# Altium PCB Grant..PcbDoc (part 5 of 5)
Units mil, origin at the board's own origin, x right, y up, seen from the top; angles counter-clockwise.
Board outline 2981 x 2481 mil, 2 copper layers (Top Layer, Bottom Layer), stack 57 mil thick; 181 components, 108 nets, 631 pads, 224 vias.
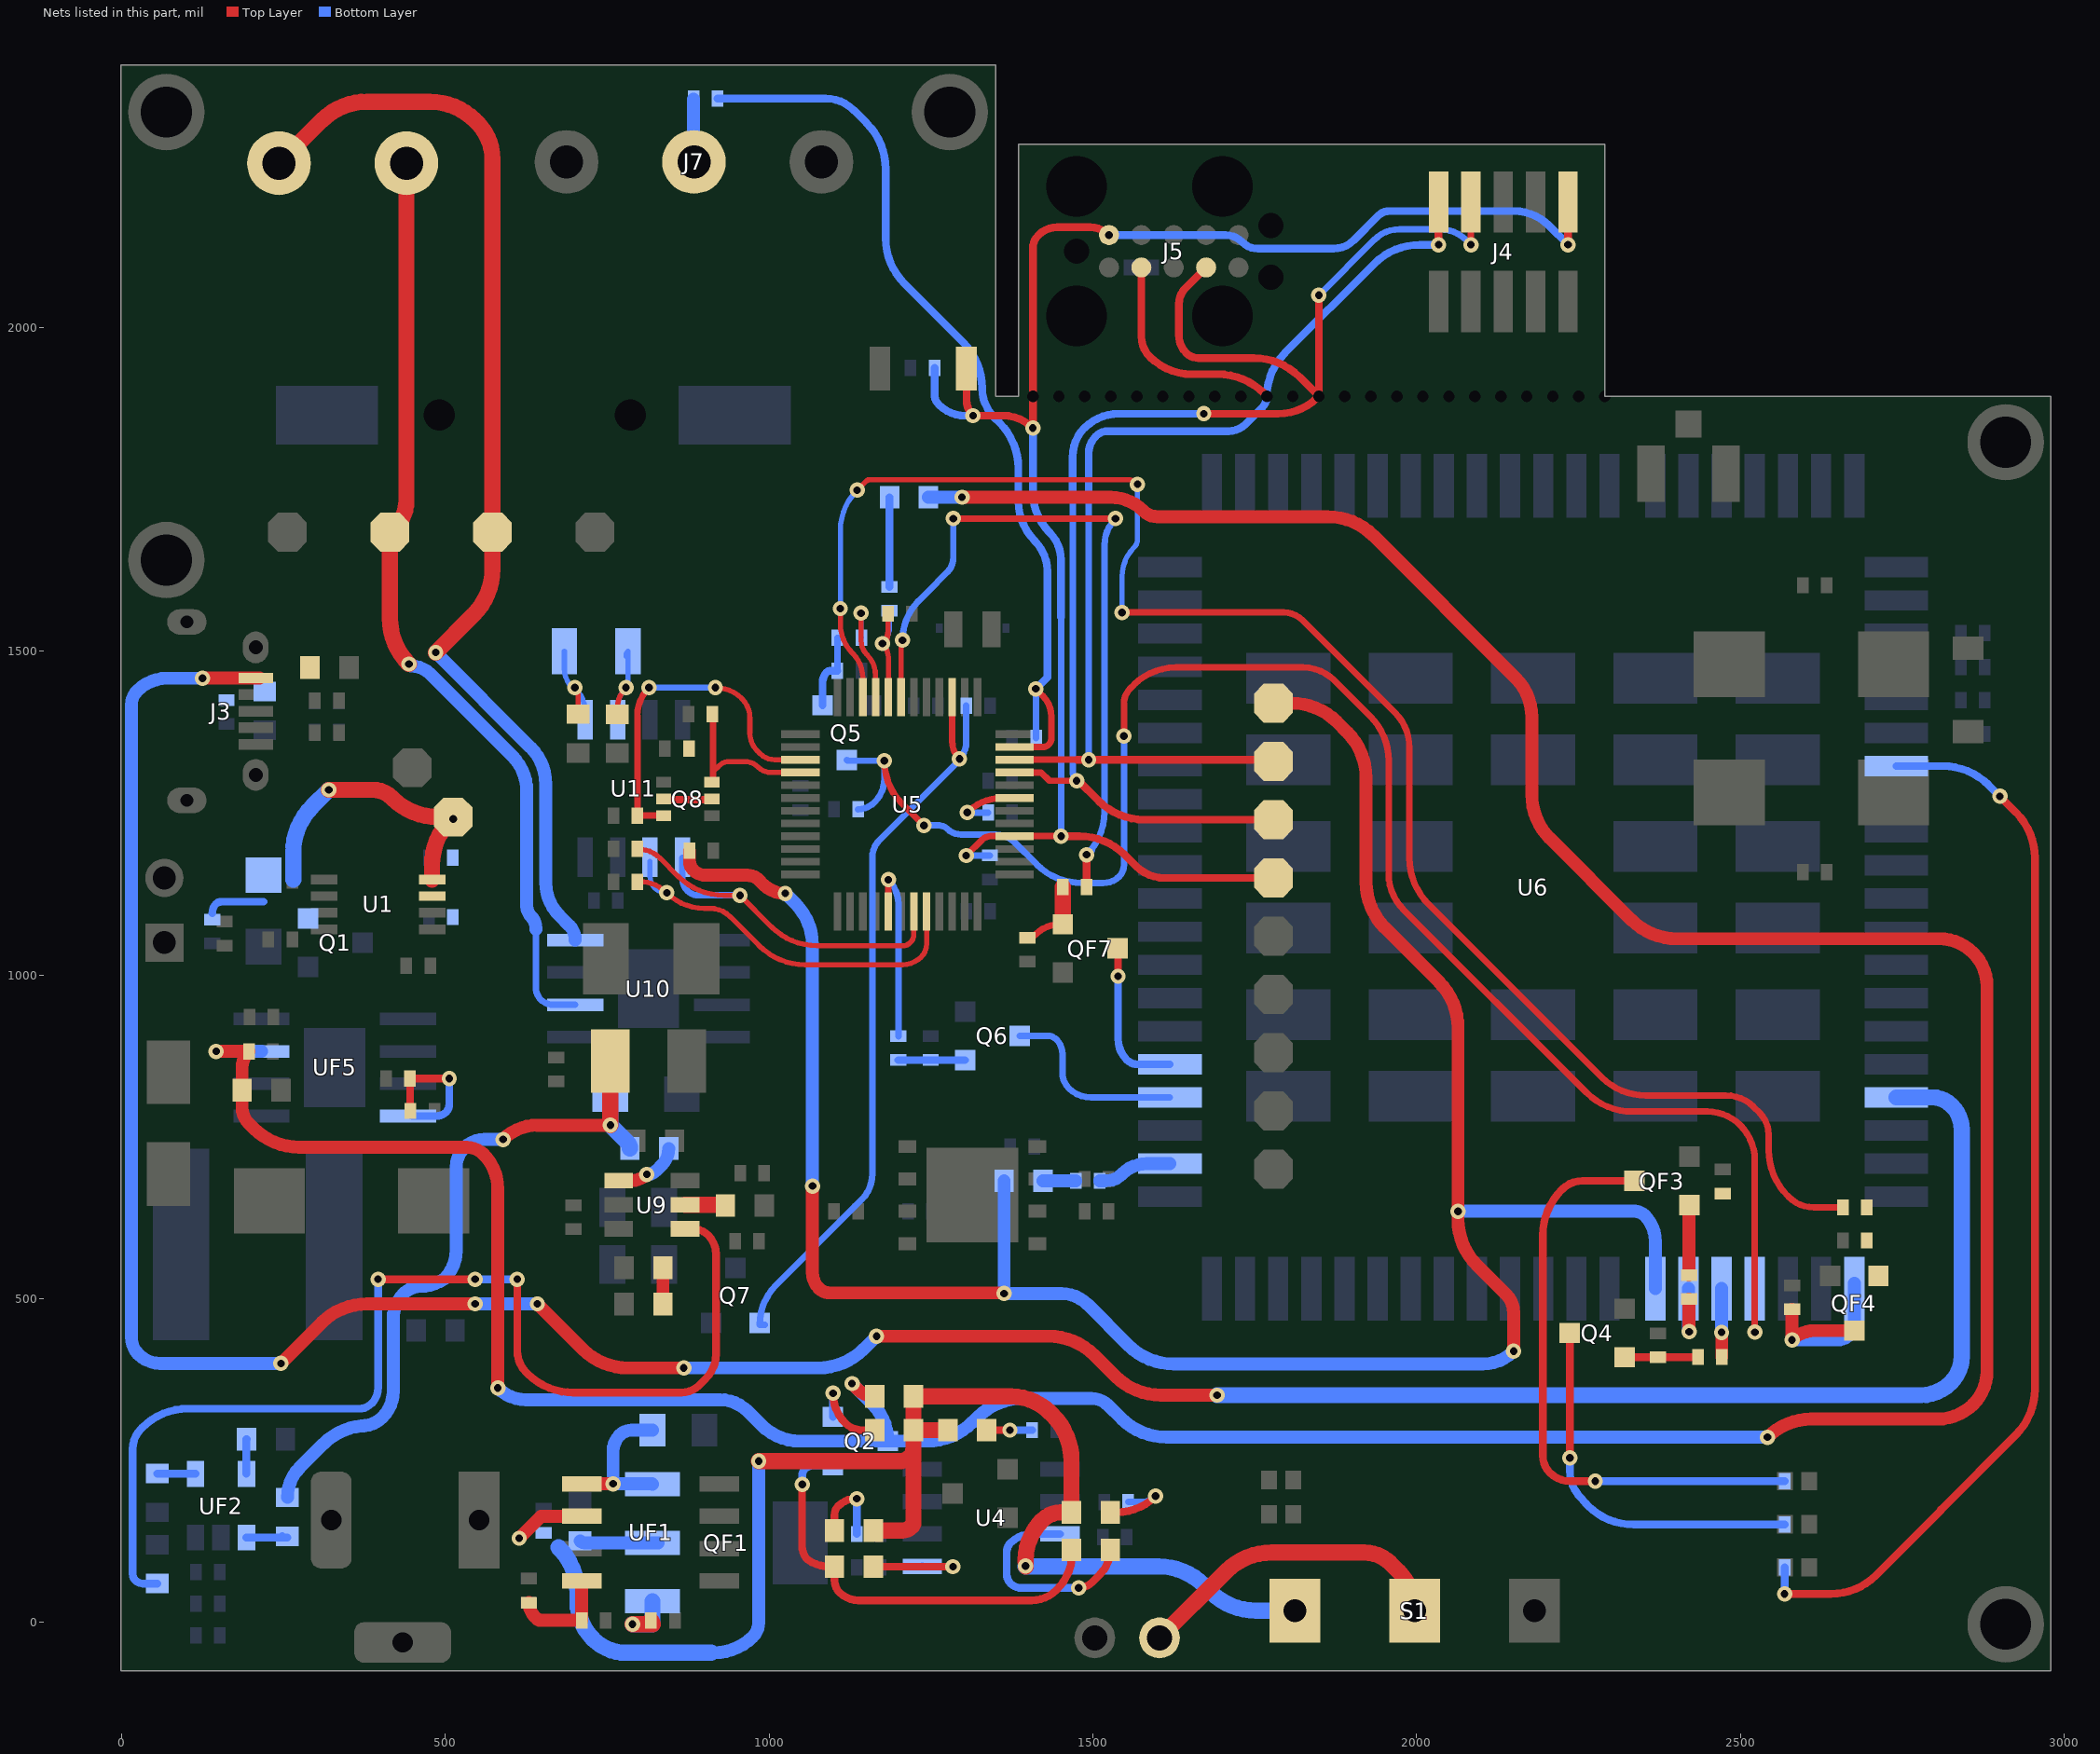
[diagram p3: the nets of this part, all layers, seen from the top]

## Via types
v1: diameter 23.62, hole 11.81, Top Layer to Bottom Layer, 224 vias

## Nets (pads, with @x,y where several pads share a name; then routed paths per layer and width w, separated by ;. In a path a pad name is that pad's centre, name@x,y a point inside that pad or via, vN(x,y) a via of type N, cw(c..) or ccw(c..) an arc to the next point about the centre after c; other vN are vias at no path point) (continued)
NETMODE_: R13.2 U6.5 | length 106.3
  Top Layer w20: R13.2@2471.5,410 v1@2471.5,448.68
  Bottom Layer w20: v1@2471.31,448 U6.5@2471.31,515.65
  other v1: 2471.18,448
NetQ2_1: Q2.1 SB16.2 SB17.2 | length 685.1
  Top Layer w12: v1(1051.13,213) 1051,212.87 1051,117.5 ccw(c1080.15,117.5) 1059.54,96.88 ccw(c1094.46,147.46) 1094.46,86 SB16.2@1101,86 1101,65.31 ccw(c1128.31,65.31) 1109,46 ccw(c1137.97,74.97) 1137.97,34 1405.37,34 ccw(c1405.37,88.63) 1444,50 ccw(c1383.64,110.36) 1466.23,88.77 ccw(c1407.05,98.37) 1467,98.37 SB17.2@1467,112
  Bottom Layer w12: v1(1051.13,213) 1051.13,227.16 cw(c1064.34,227.16) 1055,236.5 cw(c1069.71,221.79) 1069.71,242.59 Q2.1@1098.68,242.59
NetQ2_2: Q2.2 SB20.2 | length 138.7
  Top Layer w12: v1(1098.68,354) 1098.68,353.63 ccw(c1163.21,353.63) 1117.58,308 ccw(c1144.13,334.56) 1144.13,297 SB20.2@1163,297 ccw(c1160.59,294.59) SB20.2@1160.59,298
  Bottom Layer w12: Q2.2@1098.68,317.4 v1(1098.68,354)
NetQ4_1: Q4.1 R13.1 R16.1 | length 112.2
  Top Layer w12: Q4.1@2321.32,409.59 R13.1@2433.51,409.59
NetQ4_3: Q4.3 R11.1 | length 587
  Top Layer w12: v1(2236.68,254) Q4.3@2236.68,446.99
  Bottom Layer w12: v1(2236.68,254) 2236.68,234.71 ccw(c2297.84,234.71) 2254.59,191.45 ccw(c2322.36,243.36) 2262,183 2264.71,180.29 ccw(c2335.42,251) 2335.42,151 R11.1@2568.5,151
NetQ5_1: Q5.1 R14.1 R17.1 | length 120.7
  Bottom Layer w10: R17.1@1105.5,1470 R14.1@1105.5,1521
  Bottom Layer w12: Q5.1@1082.59,1416.69 1082.59,1452.03 cw(c1104.47,1452.03) 1089,1467.5 cw(c1095.04,1461.46) 1095.04,1470 R17.1@1105.5,1470
NetQ6_1: Q6.1 R18.1 R19.1 | length 103.1
  Bottom Layer w12: R18.1@1199.61,868.5 1249.41,868.5 1249.5,868.59 Q6.1@1302.68,868.59
NetQF1_1: QF1.1 RF2.1 | length 104
  Top Layer w25: v1(789,-3) 819.96,-3 820,-3.04 ccw(c811.46,-3.04) RF2.1@817.5,3
  Bottom Layer w25: v1(789,-3) 819.83,-3 QF1.1@819.83,32.45
NetQF3_1: QF3.1 RF7.1 RF8.1 | length 108.3
  Top Layer w20: RF7.1@2421,536.39 2421,644.27 QF3.1@2421.32,644.59
NetQF3_3: QF3.3 R31.1 | length 930.2
  Top Layer w12: v1(2276,218) 2237.38,218 cw(c2237.38,262.38) 2206,231 cw(c2232.56,257.56) 2195,257.56 2195,597.58 cw(c2295,597.58) 2224.29,668.29 2225,669 cw(c2256.37,637.63) 2256.37,681.99 QF3.3@2336.68,681.99
  Bottom Layer w12: v1(2276,218) R31.1@2568.5,218
NetQF4_1: QF4.1 RF10.1 RF11.1
NetQF7_1: QF7.1 RF13.1 RF14.1 | length 117.9
  Top Layer w10: RF14.1@1399,1057.5 ccw(c1399,1075.35) 1411.62,1062.73 cw(c1449.48,1024.88) 1449.48,1078.41 QF7.1@1453.68,1078.41
  Top Layer w25: RF13.1@1453.5,1136 1453.5,1078.59 QF7.1@1453.68,1078.41
NetR6_2: R6.2 SB15.2 | length 121.6
  Top Layer w12: SB15.2@1527,170 1536.64,170 ccw(c1536.64,255.36) v1(1597,195)
  Bottom Layer w10: R6.2@1554.5,186 1575.27,186 ccw(c1575.27,216.73) v1(1597,195)
NetR7_2: R7.2 SB19.2 | length 70.5
  Top Layer w12: SB19.2@1336,297 v1(1372,297)
  Bottom Layer w12: v1(1372,297) R7.2@1406.5,297
NetR12_2: R12.2 SB4.2 | length 50.5
  Bottom Layer w20: SB4.2@1423,682 R12.2@1473.5,682
NetR21_1: R21.1 SB13.1 | length 56.5
  Top Layer w20: SB13.1@836,491.5 R21.1@836,548
NetRP1_2: RP1.2 SB18.2 | length 125.5
  Top Layer w12: SB18.2@1101,142 1101,165.51 cw(c1121.49,165.51) 1107,180 cw(c1133.56,153.44) 1133.56,191 v1(1135.5,191)
  Bottom Layer w12: RP1.2@1135.5,136.5 v1(1135.5,191)
NetRP3_2: RP3.2 SB14.2 | length 138.5
  Bottom Layer w12: RP3.2@1186,1599.5 SB14.2@1186,1738
NetSB5_2: SB5.2 U9.5 | length 62.6
  Top Layer w25: U9.5@870.18,645 930.09,645 cw(c930.09,641.59) SB5.2@932.5,644
NetSB6_2: SB6.2 UF2.5 | length 53.7
  Bottom Layer w12: UF2.5@192.74,229.43 192.74,282.74 SB6.2@193,283
NetSB7_1: SB7.1 U9.1 | length 102.5
  Top Layer w20: U9.1@767.82,682.4 787.83,682.4 ccw(c787.83,715.17) v1(811,692)
  Bottom Layer w20: v1(811,692) ccw(c811,713.31) 826.07,698.24 834.52,706.69 ccw(c809.2,732) SB7.1@845,732
NetSB8_1: SB8.1 UF2.1 | length 68.6
  Bottom Layer w12: UF2.1@192.74,131 255.5,131 SB8.1@256,131 ; SB8.1@243.17,131 ccw(c243.17,137.83) SB8.1@248,133
NetSB9_1: SB9.1 U9.4 | length 1758.6
  Top Layer w12: v1(396,530) v1(546,530) ; v1(611,530) 611,419.8 ccw(c658.8,419.8) 625,386 626.71,384.29 ccw(c697.42,455) 679.77,356.57 ccw(c697.42,455) 697.42,355 864.94,355 ccw(c864.94,392.56) 891.5,366 902.63,377.13 ccw(c865.51,414.24) 918,414.24 918,569.03 ccw(c877.03,569.03) 906,598 ccw(c882.83,574.83) 882.83,607.6 U9.4@870.18,607.6
  Bottom Layer w12: SB9.1@55,60 33.07,60 cw(c33.07,77.07) 21,65 cw(c30.66,74.66) 17,74.66 17,267.62 cw(c61.38,267.62) 30,299 32.01,301.01 cw(c102,231.02) 102,330 366.69,330 ccw(c366.69,357.31) 386,338 ccw(c361.86,362.14) 396,362.14 396,478.21 ; 395.79,478 396,478.21 ; v1(396,530) 396,478.21 ; v1(546,530) v1(611,530)
NetSB10_2: SB10.2 UF2.4 | length 59.2
  Bottom Layer w12: SB10.2@55,230 ccw(c56.39,231.39) 56.39,229.43 UF2.4@114,229.43
NetSB16_1: SB16.1 U4.1 | length 170.4
  Top Layer w12: SB16.1@1161,86 v1(1284,86)
  Bottom Layer w12: U4.1@1236.7,86.5 ccw(c1237.91,87.71) 1237.91,86 v1(1284,86)
NetSB17_1: SB17.1 U4.7 | length 356
  Top Layer w12: v1(1478,53.21) ccw(c1478,82.69) 1498.84,61.84 1511.45,74.45 ccw(c1473.89,112) SB17.1@1526.02,101.84 ; SB17.1@1527,112 cw(c1473.89,112) SB17.1@1526.02,101.84 ; SB17.1@1529,102.38 1529,112 cw(c1510.2,112) SB17.1@1526.02,101.84
  Bottom Layer w12: U4.7@1449.3,136.5 1405.59,136.5 ccw(c1405.59,90.41) 1373,123 ccw(c1387.49,108.51) 1367,108.51 1367,74.49 ccw(c1387.49,74.49) 1373,60 ccw(c1389.39,76.39) 1389.39,53.21 v1(1478,53.21)
NETSTATUS_: RF7.2 U6.6 | length 119.4
  Top Layer w20: v1(2421,449) RF7.2@2421,499.39
  Bottom Layer w20: v1@2420.13,449 v1@2420.13,451.09 ; U6.6@2420.13,515.65 v1@2420.13,451.09 ; v1(2421,449) cw(c2423.09,451.09) v1@2420.13,451.09
NRST_: C18.1 J4.10 J5.10 P9.1 pad.NC@1407.37,1894 R9.1 SW1.1 U5.40 | length 2709.8
  Top Layer w10: v1(1304.5,1184.5) 1329.08,1209.08 cw(c1342,1196.16) 1342,1214.43 U5.40@1379.09,1214.43 v1(1451,1214.43)
  Top Layer w12: SW1.1@1304.93,1937 1304.93,1888.31 ccw(c1339.31,1888.31) v1(1315,1864) 1361.5,1864 cw(c1361.5,1799.13) v1(1407.37,1845) pad.NC@1407.37,1894 1407.37,2122.17 cw(c1436.83,2122.17) 1416,2143 cw(c1444.97,2114.03) 1444.97,2155 1496.03,2155 cw(c1496.03,2114.03) v1(1525,2143) ; v1(1451,1214.43) 1479.15,1214.43 cw(c1479.15,1114.43) 1549.86,1185.14 1567,1168 ; 1567.03,1167.97 ccw(c1610.46,1211.46) 1610.46,1150 P9.1@1779,1150 ; v1(2234,2128) J4.10@2234,2194
  Bottom Layer w10: v1(1304.5,1184.5) R9.1@1341,1184.5 ; 1450.81,1553 1450.81,1214.62 v1(1451,1214.43)
  Bottom Layer w12: C18.1@1255.5,1938 1255.5,1896.69 ccw(c1277.69,1896.69) 1262,1881 ccw(c1303.04,1922.04) 1303.04,1864 v1(1315,1864) ; v1(1407.37,1845) 1407.37,1745.88 ccw(c1494.88,1745.88) 1433,1684 cw(c1390,1641) 1450.81,1641 1450.81,1553 ; v1(1525,2143) 1704.44,2143 cw(c1704.44,2105.44) 1730.97,2132.03 ; 1731.02,2131.98 ccw(c1755.14,2156.14) 1755.14,2122 1871.62,2122 ccw(c1871.62,2166.38) 1903,2135 1940.93,2172.93 cw(c1958,2155.86) 1958,2180 2151,2180 cw(c2151,2105.16) 2203.92,2158.08 v1(2234,2128)
OUT_1: J8.1 P14.1 U10.6 | length 1446.8
  Top Layer w25: P14.1@414.14,1698.79 422.29,1690.63 ccw(c379.9,1733.03) 439.85,1733.03 J8.1@439.85,2254 ; P14.1@414.33,1684 414.33,1551.09 ccw(c514.33,1551.09) v1(443.62,1480.38)
  Bottom Layer w10: 639.81,1070.81 639.81,980.77 ccw(c667.77,980.77) 646.53,962.58 ccw(c667.26,983.31) 667.26,954 U10.6@700.62,954
  Bottom Layer w20: v1@446.71,1477.29 cw(c446.71,1435.04) 476.44,1465.06 cw(c446.71,1435.04) 476.57,1464.93 ; 476.58,1464.92 603.23,1338.27 cw(c548.96,1284) 625.71,1284 625.71,1106.18 ccw(c647.18,1106.18) 632,1091 cw(c613.14,1072.14) 639.81,1072.14 639.81,1070.81
OUT_2: J8.2 P15.1 U10.8 | length 1732.6
  Top Layer w25: J8.2@243,2254 308.71,2319.71 cw(c379.42,2249) 351.42,2345 cw(c379.42,2249) 379.42,2349 475.58,2349 cw(c475.58,2249) 546.29,2319.71 549,2317 cw(c491.86,2259.86) 572.67,2259.86 P15.1@572.67,1684 572.67,1627.09 cw(c472.67,1627.09) 543.38,1556.38 v1(485.15,1498.15)
  Bottom Layer w20: v1(485.15,1498.15) 631.54,1351.76 cw(c574.9,1295.12) 655,1295.12 655,1142.7 ccw(c726.7,1142.7) 676,1092 691.16,1076.84 cw(c668.32,1054) U10.8@700.62,1054
PA2_: Q7.1 R26.1 U5.3 | length 1185.3
  Top Layer w10: U5.3@1282.63,1429 1282.63,1361.45 ccw(c1321.45,1361.45) v1(1294,1334)
  Bottom Layer w10: Q7.1@993.71,459.68 985.41,459.68 cw(c1071.67,459.68) 1010.67,520.67 1143,653 ; 1143.03,653.03 ccw(c1103.42,692.58) 1159.39,692.58 1159.39,1181.69 cw(c1197.31,1181.69) 1170.48,1208.48 1292.59,1330.59 ccw(c1289.17,1334) v1(1294,1334) ccw(c1268.65,1359.35) 1304.5,1359.35 R26.1@1304.5,1416
PA4_: R14.2 U5.9 | length 174.2
  Top Layer w8: v1(1142,1559) 1142,1516.73 ccw(c1172.73,1516.73) 1151,1495 cw(c1118.36,1462.36) 1164.52,1462.36 U5.9@1164.52,1429
  Bottom Layer w8: v1(1142,1559) 1142,1522.21 ccw(c1143.71,1522.21) R14.2@1142.5,1521
PA5_: RF10.2 U5.10 | length 2644.2
  Top Layer w8: v1(1110,1566) 1110,1542.87 ccw(c1174.87,1542.87) 1129,1497 cw(c1090.77,1458.77) 1144.83,1458.77 U5.10@1144.83,1429 ; v1(1136,1749) 1150.07,1763.07 cw(c1154.73,1758.41) 1154.73,1765 1554.51,1765 cw(c1554.51,1746.93) 1567.29,1759.71 v1(1569,1758)
  Top Layer w10: v1(1545,1560) 1795,1560 cw(c1795,1518.96) 1824.02,1547.98 1966.5,1405.5 cw(c1912.18,1351.18) 1989,1351.18 1989,1180.42 ccw(c2089,1180.42) 2018.29,1109.71 2286,842 ccw(c2353.6,909.6) 2353.6,814 2477.54,814 cw(c2477.54,752.54) 2521,796 2529.86,787.14 cw(c2495.72,753) 2544,753 2544,729.42 ccw(c2644,729.42) 2573.29,658.71 2575,657 ccw(c2613.63,695.63) 2613.63,641 RF10.2@2658.5,641
  Bottom Layer w8: v1(1110,1566) 1110,1686.23 cw(c1198.77,1686.23) v1(1136,1749) ; v1(1545,1560) 1545,1615.03 cw(c1609.65,1615.03) 1563.94,1660.75 ccw(c1551.71,1672.97) 1569,1672.97 v1(1569,1758)
PA20_: R18.2 U5.29 | length 294.7
  Top Layer w10: U5.29@1184.2,1098.29 v1(1184.2,1147.2)
  Bottom Layer w10: v1(1184.2,1147.2) cw(c1147,1110) 1199.61,1110 R18.2@1199.61,905.5
PB8_: RF13.2 U5.7 | length 1145.6
  Top Layer w8: U5.7@1203.89,1429 1203.89,1512.16 cw(c1211.09,1512.16) v1(1206,1517.25)
  Top Layer w10: v1(1284.47,1705) v1(1535,1705)
  Top Layer w12: RF13.2@1490.5,1136 v1(1490.5,1185.79)
  Bottom Layer w8: v1(1206,1517.25) cw(c1292.3,1517.25) 1206.01,1518.27 cw(c1292.3,1517.25) v1@1206.04,1519.78
  Bottom Layer w10: v1@1206.04,1519.78 cw(c1292.3,1517.25) 1228.03,1574.85 cw(c1292.3,1517.25) 1231.25,1578.25 ; 1231.28,1578.28 1244.5,1591.5 1275,1622 ccw(c1252.13,1644.87) 1284.47,1644.87 v1(1284.47,1705) ; v1(1490.5,1185.79) ccw(c1424.11,1252.18) 1518,1252.18 1518,1663.96 cw(c1576.04,1663.96) v1(1535,1705)
  Bottom Layer w12: v1(1490.5,1185.79) v1@1497.71,1193
PB9_: RP3.1 RP4.1 U5.8 | length 208.7
  Top Layer w8: v1(1175,1512) ccw(c1154.48,1532.52) 1183.5,1532.52 ; RP4.1@1183.5,1558 1183.5,1532.52 ; U5.8@1184.2,1429 1184.2,1489.78 ccw(c1152.78,1489.78) 1177,1509.8 ccw(c1161.31,1525.49) 1183.5,1525.49 1183.5,1532.52
  Bottom Layer w8: v1(1175,1512) ccw(c1148.44,1538.56) 1186,1538.56 RP3.1@1186,1562.5
PWRKEY: QF7.3 U6.21 | length 244.1
  Top Layer w12: QF7.3@1538.32,1041.01 cw(c1536.69,1039.37) 1539,1039.37 v1(1539,998)
  Bottom Layer w12: v1(1539,998) 1539,901.59 ccw(c1585.09,901.59) 1552.5,869 ccw(c1569.13,885.63) 1569.13,862.11 U6.21@1618.95,862.11
RESET_N: Q6.3 U6.20 | length 298.3
  Bottom Layer w10: Q6.3@1387.32,905.99 1430.98,905.99 cw(c1430.98,888.32) 1443.48,900.82 cw(c1420.5,877.83) 1453,877.83 1453,849.14 ccw(c1487.14,849.14) 1463,825 ccw(c1496.97,858.97) 1496.97,810.93 U6.20@1618.95,810.93
RXD: Q8.3 RS2.2 U5.15 | length 551.2
  Top Layer w8: v1(917,1444) cw(c917,1386.06) 957.97,1427.03 cw(c928.33,1397.38) 970.25,1397.38 970.25,1374 ccw(c1009.48,1374) 977,1352 ccw(c1009.48,1374) 981.72,1346.28 ; 981.74,1346.26 986.23,1341.77 ccw(c1008.51,1364.05) 1008.51,1332.54 U5.15@1048.38,1332.54
  Top Layer w10: v1(814.5,1444) ccw(c857.96,1400.54) 796.5,1400.54 796.5,1246.35 Q8.3@839.1,1246.35
  Bottom Layer w10: v1(814.5,1444) v1(917,1444)
SCL_: R24.1 U5.32 U11.6 | length 618.7
  Top Layer w8: R24.1@796.5,1144 800.96,1144 cw(c800.96,1085.96) 812.37,1142.87 cw(c800.96,1085.96) v1(842,1127) ccw(c899.94,1184.94) 899.94,1103 908.62,1103 cw(c908.62,1058.62) 940,1090 984.71,1045.29 ccw(c1055.42,1116) 1055.42,1016 1206.03,1016 ccw(c1206.03,1056.97) 1235,1028 ccw(c1215.06,1047.94) 1243.26,1047.94 U5.32@1243.26,1098.29
  Bottom Layer w8: U11.6@816,1175.7 816,1152.21 ccw(c840.66,1152.21) 823.22,1134.78 ccw(c842,1153.56) v1(842,1127)
SDA_: R23.1 U5.31 U11.5 | length 659.5
  Top Layer w8: R23.1@796.5,1194.75 cw(c796.5,1144.65) 831.93,1180.07 859.71,1152.29 ccw(c930.42,1223) 930.42,1123 v1(955,1123) 1003.42,1074.58 ccw(c1074.13,1145.29) 1074.13,1045.29 1206.63,1045.29 ccw(c1206.63,1061.37) 1218,1050 1218.46,1050.46 ccw(c1206.1,1062.81) 1223.57,1062.81 U5.31@1223.57,1098.29
  Bottom Layer w10: U11.5@866,1180.7 866,1175.7 866,1149.31 ccw(c893.31,1149.31) 874,1130 ccw(c890.9,1146.9) 890.9,1123 v1(955,1123)
SENS_IN: J7.2 R27.2 | length 97.8
  Bottom Layer w20: J7.2@883,2255 R27.2@883,2352.79
SNS_: QF1.3 RF1.1 UF1.1 | length 240.1
  Top Layer w20: UF1.1@710.7,214 v1(759,214)
  Bottom Layer w20: QF1.3@819.83,213.55 ccw(c818.74,212.47) 818.74,214 v1(759,214) 759,264.86 cw(c793.14,264.86) 769,289 cw(c788.31,269.69) 788.31,297 RF1.1@820,297
STATUS_: R10.1 U6.61 | length 1683.5
  Top Layer w12: v1(2568.5,44) 2639.99,44 ccw(c2639.99,143.01) 2710,73 2809.29,172.29 ccw(c2807.59,174) 2810,174 2925.71,289.71 ccw(c2855,360.42) 2955,360.42 2955,1181 ccw(c2856.02,1181) 2926.01,1250.99 v1(2901,1276)
  Bottom Layer w12: v1(2568.5,44) R10.1@2568.5,85 ; U6.61@2741,1322.74 2812.84,1322.74 cw(c2812.84,1222.74) 2883.55,1293.45 v1(2901,1276)
SW_: D3.A L1.2 SB7.2 SB8.2 | length 1128
  Top Layer w20: v1(589,746) cw(c642.11,692.89) 642.11,768 v1(754.89,768)
  Top Layer w25: v1(754.89,768) L1.2@754.89,867
  Bottom Layer w20: SB8.2@256,193 cw(c321.18,193) 275.07,239.07 ; 275.09,239.09 311.76,275.76 cw(c379.91,207.62) 370.53,303.53 ; 402.97,316.97 cw(c370.53,349.4) 376.57,303.93 ; 402.99,316.99 ccw(c363.17,356.76) 419.45,356.76 ; 419.49,356.76 419.45,356.81 419.45,469.46 cw(c472.54,469.46) 435,507 437.1,509.1 cw(c461,485.2) 461,519 ccw(c461,584.18) 498.62,530.95 ccw(c454.95,574.63) 516.71,574.63 516.71,703.33 cw(c558.67,703.33) 529,733 cw(c560.38,701.62) 560.38,746 v1(589,746) ; 370.53,303.53 cw(c379.91,207.62) 376.57,303.93 ; 370.53,303.53 ccw(c370.53,349.4) 376.57,303.93 ; 370.53,303.53 ccw(c370.53,349.4) 376.57,303.93
  Bottom Layer w25: D3.A@754.89,817.99 v1(754.89,768) 780.84,742.05 cw(c770.78,732) SB7.2@785,732
SWDCLK: J4.4 J5.4 P10.1 pad.NC@1849.1,1894 U5.45 | length 2235.1
  Top Layer w10: U5.45@1379.09,1312.86 1420.14,1312.86 1433,1300 v1(1475,1300) v1@1478,1300 ; 1659.77,1953.23 ccw(c1663.31,1980.31) 1663.31,1953 ; v1(2084,2128) J4.4@2084,2194
  Top Layer w12: v1@1478,1300 1508.71,1269.29 ccw(c1579.42,1340) 1579.42,1240 P10.1@1779,1240 ; 1659.77,1953.23 cw(c1663.31,1980.31) 1644,1961 cw(c1670.56,1987.56) 1633.98,1979.02 cw(c1670.56,1987.56) 1633,1987.56 1633,2036.86 cw(c1667.14,2036.86) 1642.98,2060.98 J5.4@1675,2093 ; 1663.31,1953 1748.68,1953 cw(c1748.68,1853) 1819.39,1923.71 pad.NC@1849.1,1894 ; v1(1671.34,1867) 1786.34,1867 ccw(c1786.34,1953.34) 1847.39,1892.29 pad.NC@1849.1,1894 ; v1(1849.1,2050) pad.NC@1849.1,1894
  Bottom Layer w10: 1469,1747 1469,1314.49 ccw(c1489.49,1314.49) v1(1475,1300) ; v1(1849.1,2050) 1935.07,2135.96 ; 1935.09,2135.99 cw(c1973.78,2097.25) 1973.78,2152 2036,2152 cw(c2036,2094.06) 2076.97,2135.03 v1(2084,2128)
  Bottom Layer w12: 1469,1747 1469,1801.54 cw(c1530.46,1801.54) 1487,1845 cw(c1540.11,1791.89) 1540.11,1867 v1(1671.34,1867)
SWDIO: J4.2 J5.2 P11.1 pad.NC@1768.79,1894 U5.46 | length 1977.4
  Top Layer w10: U5.46@1379.09,1332.54 1475.54,1332.54
  Top Layer w12: 1475.54,1332.54 v1(1493.54,1332.54) 1776.46,1332.54 P11.1@1779,1330 ; J5.2@1575,2093 1575,1986.38 ccw(c1619.38,1986.38) 1588,1955 ccw(c1653.18,2020.18) 1653.18,1928 1693.37,1928 cw(c1693.37,1828) 1764.08,1898.71 pad.NC@1768.79,1894 ; v1(2034,2128) J4.2@2034,2194
  Bottom Layer w10: v1(1493.54,1332.54) 1493.54,1733.12
  Bottom Layer w12: 1493.54,1733.12 1493.54,1805.55 cw(c1531.45,1805.55) 1504.65,1832.35 cw(c1523.1,1813.9) 1523.1,1840 1709.44,1840 ccw(c1709.44,1877.56) 1736,1851 1761.57,1876.57 ccw(c1744.13,1894) pad.NC@1768.79,1894 cw(c1862.43,1894) 1796.21,1960.21 1934.71,2098.71 cw(c2005.42,2028) 2005.42,2128 v1(2034,2128)
TS_: RF3.1 RF4.1 UF1.4 | length 159.6
  Top Layer w20: RF3.1@629,30.5 ccw(c659.18,30.5) 637.84,9.16 641,6 ccw(c648.24,13.24) 648.24,3 RF4.1@710.5,3 710.7,3.2 UF1.4@710.7,64
TXD: Q8.6 RS4.2 U5.16 | length 252.1
  Top Layer w8: 913.5,1314 922.46,1322.96 cw(c939,1306.42) 939,1329.81 962.03,1329.81 cw(c962.03,1299.82) 983.23,1321.03 ; 983.26,1321 ccw(c1002.95,1340.75) 1002.95,1312.86 U5.16@1048.38,1312.86
  Top Layer w10: RS4.2@913.5,1403 913.5,1314 913.5,1296.93 913.9,1296.53 Q8.6@914.23,1296.86
USB_BOOT: R12.1 U6.115 | length 115.6
  Bottom Layer w20: R12.1@1510.5,682 1519.46,682 ccw(c1519.46,718.12) 1545,692.58 cw(c1583.6,653.98) 1583.6,708.57 U6.115@1618.95,708.57
VBAT: CF1.1 CF2.1 Q2.3 SB2.2 SB14.1 UF5.7 | length 6189.1
  Top Layer w20: v1(146,882) CF1.1@196.5,882 ccw(c221.85,856.65) 186,856.65 CF2.1@186,822 186,795.14 ccw(c220.14,795.14) 196,771 203.71,763.29 ccw(c274.42,834) 274.42,734 532.44,734 cw(c532.44,696.44) 559,723 cw(c505.89,669.89) 581,669.89 v1(581,362) ; v1(1128,369) 1137.39,359.61 ccw(c1163,385.21) SB2.2@1163,349 ; v1@1299,1738 1527.3,1738 cw(c1527.3,1666.3) 1578,1717 ccw(c1599.73,1738.73) 1599.73,1708 1862.58,1708 cw(c1862.58,1608) 1933.29,1678.71 2152.5,1459.5 cw(c2090.94,1397.94) 2152.54,1459.46 cw(c2090.94,1397.94) 2178,1397.94 2178,1278.62 ccw(c2273.65,1278.62) 2206.01,1210.99 2331.71,1085.29 ccw(c2402.42,1156) 2402.42,1056 2806.89,1056 cw(c2806.89,980.89) 2860,1034 cw(c2809.3,983.3) 2881,983.3 2881,387.7 cw(c2809.3,387.7) 2860,337 cw(c2804.47,392.53) 2804.47,314 2609.6,314 ccw(c2609.6,218.4) v1(2542,286)
  Bottom Layer w20: v1(146,882) UF5.7@215.81,882 ; v1(581,362) ccw(c624.46,405.46) 624.46,344 923.3,344 cw(c923.3,281.95) 967.17,325.83 988.37,304.63 ccw(c1047.84,364.1) 1047.84,279.99 Q2.3@1183.32,279.99 ; v1(1128,369) 1159.51,337.49 cw(c1102,279.99) Q2.3@1183.32,279.99 ; SB14.1@1246,1738 v1(1298,1738) ; v1(2542,286) 1614.42,286 cw(c1614.42,386) 1543.71,315.29 1524,335 ccw(c1497.44,308.44) 1497.44,346 1392.42,346 ccw(c1392.42,246) 1321.71,316.71 1314.28,309.28 cw(c1243.57,379.99) 1243.57,279.99 Q2.3@1183.32,279.99
VBAT_IN: C9.1 C10.1 QF1.2 S1.1 SB2.1 SB15.1 SB18.1 SB19.1 SB20.1 U4.8 UF1.2 | length 2428.9
  Top Layer w20: v1(614,130) 648,164 UF1.2@710.7,164
  Top Layer w25: v1(984,249) 1201.1,249 ccw(c1201.1,272.9) 1218,256 ccw(c1205.93,268.07) 1223,268.07 ; SB18.1@1161,142 1205.51,142 ccw(c1205.51,162.49) 1220,148 ccw(c1212.76,155.24) 1223,155.24 1223,268.07 ; SB19.1@1276,297 SB20.1@1223,297 ; v1@1396.43,86.54 cw(c1484.77,95.23) 1422,158 cw(c1450.97,129.03) 1450.97,170 SB15.1@1467,170 1467,249.58 ccw(c1367,249.58) 1437.71,320.29 1434,324 ccw(c1373.64,263.64) 1373.64,349 SB2.1@1223,349 SB20.1@1223,297 ; 1223,268.07 SB20.1@1223,297
  Bottom Layer w20: C9.1@708,126 ccw(c715.24,133.24) 715.24,123 QF1.2@819.83,123 QF1.2@828.83,123 ; 910.6,-47 914.64,-47 ccw(c914.64,38.36) 975,-22 ccw(c953.27,-0.27) 984,-0.27 v1(984,249)
  Bottom Layer w25: 674.71,115.79 cw(c604,45.08) 704,45.08 704,32.42 ccw(c786.1,32.42) 728.05,-25.63 ccw(c779.63,25.95) 728.25,-25.84 ccw(c779.63,25.95) 779.63,-47 910.6,-47 ; v1@1396,86.5 U4.8@1449.3,86.5 1601.08,86.5 cw(c1601.08,-13.5) 1671.79,57.21 1681.71,47.29 ccw(c1752.42,118) 1752.42,18 S1.1@1811.96,18
  other v1: 1396,87
VBAT_M: P17.1 S1.2 | length 496.5
  Top Layer w25: P17.1@1603,-24 1705.71,78.71 cw(c1776.42,8) 1776.42,108 1918.96,108 cw(c1918.96,49.96) 1960,91 1971.54,79.46 cw(c1910.09,18) S1.2@1997,18
VDD_C: C15.1 U5.43 | length 117.7
  Top Layer w10: v1(1306,1251) cw(c1360.29,1196.71) v1@1307.52,1252.48 ; v1(1306,1251) v1@1307.52,1252.48 ; U5.43@1379.09,1273.49 1360.29,1273.49 ccw(c1360.29,1196.71) v1@1307.52,1252.48
  Bottom Layer w10: v1@1302.04,1251 v1(1306,1251) C15.1@1338.5,1251
VDD_EXT: P3.1 Q8.2 Q8.5 RS1.1 RS3.1 SB4.1 U6.7 | length 3757
  Top Layer w12: Q8.2@839.1,1270.94 Q8.5@913.9,1270.94
  Top Layer w20: RS3.1@877,1191.94 877,1175.8 ccw(c895.83,1175.8) 882.51,1162.49 ; 882.53,1162.47 ccw(c903,1182.97) 903,1154 966.39,1154 cw(c966.39,1128.39) 984.5,1146.5 991.5,1139.5 ccw(c1024.09,1172.09) 1024.09,1126 v1(1025,1126) ; v1(1067,674) 1067,540.14 ccw(c1101.14,540.14) 1077,516 ccw(c1093.9,532.9) 1093.9,509 v1@1363,509 ; P3.1@1779,1420 1806.58,1420 cw(c1806.58,1320) 1877.29,1390.71 1892.71,1375.29 cw(c1822,1304.58) 1922,1304.58 1922,1143.42 ccw(c2022,1143.42) 1951.29,1072.71 2034.71,989.29 cw(c1964,918.58) 2064,918.58 v1(2064,635) 2064,622.42 ccw(c2164,622.42) 2093.29,551.71 2138,507 cw(c2109.03,478.03) 2150,478.03 v1(2150,419)
  Bottom Layer w20: v1(1025,1126) 1040.13,1110.87 cw(c975.26,1046) 1067,1046 v1(1067,674) ; SB4.1@1363,682 v1(1363,508) 1450.96,508 cw(c1450.96,449.96) 1492,491 1554.71,428.29 ccw(c1625.42,499) 1625.42,399 2101.72,399 ccw(c2101.72,467.28) v1(2150,419) ; v1(2064,635) 2337.51,635 cw(c2337.51,614.51) 2352,629 cw(c2311.07,588.07) 2368.95,588.07 U6.7@2368.95,515.65
VDR_Out: R27.1 R28.1 U5.47 | length 1438.9
  Top Layer w10: U5.47@1379.09,1352.23 1422.89,1352.23 ccw(c1422.89,1365.11) 1432,1356 ccw(c1422.34,1365.66) 1436,1365.66 1436,1399 ccw(c1390.13,1399) 1422.59,1431.41 ; v1(1412,1442) 1422.57,1431.44
  Bottom Layer w10: v1(1412,1442) 1412,1367.21 ccw(c1413.71,1367.21) R28.1@1412.5,1366
  Bottom Layer w12: R27.1@920.5,2354 1087.12,2354 cw(c1087.12,2292.54) 1130.58,2336 1150.71,2315.87 cw(c1080,2245.16) 1180,2245.16 1180,2138.42 ccw(c1280,2138.42) 1209.29,2067.71 1299.71,1977.29 cw(c1229,1906.58) 1329,1906.58 ccw(c1393.17,1906.58) 1347.79,1861.21 1356,1853 cw(c1285.99,1782.99) 1385,1782.99 1385,1731.36 ccw(c1470.36,1731.36) 1410,1671 cw(c1361.72,1622.72) 1430,1622.72 1430,1460 v1(1412,1442)
VIN: C1.1 C2.1 D1.K P2.1 Q1.2 RR1.2 U1.7 U1.8 | length 556
  Top Layer w25: v1(320,1286) 387.71,1286 cw(c387.71,1243.71) 417.61,1273.61 417.94,1273.29 ccw(c488.65,1344) 488.65,1244 P2.1@512,1244 508.75,1240.75 ccw(c579.46,1170.04) 479.46,1170.04 U1.8@479.46,1147.39
  Bottom Layer w12: 140,1095.51 cw(c160.49,1095.51) 146,1110 cw(c153.53,1102.47) 153.53,1113.12 219,1113.12
  Bottom Layer w25: 265,1147.5 265,1189.58 cw(c365,1189.58) 294.29,1260.29 v1(320,1286)
  other v1: 512,1241
VSNS_: RF5.2 RF6.2 UF5.4 | length 219.5
  Top Layer w12: RF5.2@446,790 cw(c447.21,791.21) 445.5,791.21 RF6.2@445.5,840.26 v1@506,840.26 ; v1@505,837 v1@506,838
  Bottom Layer w12: UF5.4@449,782 486.2,782 ccw(c486.2,803.07) 501.1,788.17 ccw(c489.27,800) 506,800 v1(506,840) v1@506,840.26
VUSB: C30.1 C31.1 J3.1 SB1.1 U6.71 | length 4675.4
  Top Layer w20: v1@125.39,1458.76 J3.1@207,1458.76 J3.1@213,1458.76 ; v1(246,400) 308.71,462.71 cw(c379.42,392) 379.42,492 v1(546,492) ; v1(642,492) 711.71,422.29 ccw(c782.42,493) 782.42,393 v1(868.14,393) ; v1(1166,442) 1431.58,442 cw(c1431.58,342) 1502.29,412.71 1534.71,380.29 ccw(c1605.42,451) 1605.42,351 v1(1692,351)
  Bottom Layer w20: v1(125,1458.36) 70.74,1458.36 ccw(c70.74,1392.26) 24,1439 ccw(c45.73,1417.27) 15,1417.27 15,440.56 ccw(c52.56,440.56) 26,414 ccw(c59.8,447.8) 59.8,400 v1(246,400) ; v1(546,492) v1(642,492) ; v1(868.14,393) 1075.58,393 ccw(c1075.58,493) 1146.29,422.29 v1(1166,442) cw(c1163.59,442) v1@1165.29,440.29
  Bottom Layer w25: v1(1692,351) 2779.13,351 ccw(c2779.13,415.87) 2825,370 ccw(c2783.96,411.04) 2842,411.04 2842,761.22 ccw(c2789.39,761.22) 2826.59,798.41 ccw(c2796.38,768.2) 2796.38,810.93 U6.71@2741,810.93
W_DISABLE: C27.2 Q5.3 U6.4 | length 2669.3
  Top Layer w10: v1(1178,1331) ccw(c1272.15,1331) 1205.58,1264.42 v1(1239,1231) ; v1(1548,1369) 1548,1418.86 cw(c1582.14,1418.86) 1558,1443 1563.13,1448.13 cw(c1628,1383.26) 1628,1475 1825,1475 cw(c1825,1407.4) 1872.8,1455.2 1929,1399 cw(c1861.4,1331.4) 1957,1331.4 1957,1155.11 ccw(c2032.11,1155.11) 1979,1102 2262.71,818.29 ccw(c2333.42,889) 2333.42,789 2449.3,789 cw(c2449.3,717.3) 2500,768 2500.22,767.78 cw(c2446.44,714) 2522.5,714 v1(2522.5,448.2)
  Bottom Layer w10: Q5.3@1119.99,1332.05 ccw(c1122.52,1334.58) 1122.52,1331 v1(1178,1331) 1178,1303.21 cw(c1126.79,1303.21) 1163.01,1267.01 1162.25,1266.25 cw(c1137.5,1291.01) C27.2@1137.5,1256 ; v1(1239,1231) 1262.93,1231 cw(c1262.93,1213.93) 1275,1226 ccw(c1296.73,1247.73) 1296.73,1217 1350,1217 cw(c1350,1175.96) 1379.02,1204.98 1412.71,1171.29 ccw(c1483.42,1242) 1483.42,1142 1516.11,1142 ccw(c1516.11,1177.2) 1541,1152.31 ccw(c1524.1,1169.21) 1548,1169.21 v1(1548,1369) ; v1(2522.5,448.2) U6.4@2522.5,515.65
WAKEUP: CF6.2 QF4.3 U6.1 | length 320
  Top Layer w20: CF6.2@2580,483.5 v1(2580,436.32) cw(c2614.66,401.66) 2614.66,450.68 QF4.3@2676.01,450.68
  Bottom Layer w20: v1(2580,436.32) 2649.04,436.32 ccw(c2649.04,465.96) 2670,445 ccw(c2655.42,459.58) 2676.04,459.58 U6.1@2676.04,515.65 U6.1@2676.04,524
X1: CX1.2 U11.1 X3.2 | length 157
  Top Layer w8: v1@701.01,1442.99 v1(700,1444) cw(c687.93,1431.93) 705,1431.93 CX1.2@705,1403
  Bottom Layer w8: X3.2@683.79,1500 683.79,1473.48 ccw(c725.48,1473.48) v1@696,1444 ; v1(700,1444) cw(c661.37,1405.37) 716,1405.37 U11.1@716,1394.3
X2: CX2.2 U11.2 X3.1 | length 164.7
  Top Layer w8: CX2.2@765.5,1402.79 765.5,1411.41 cw(c811.59,1411.41) v1(779,1444) ; CX2.2@766,1404.8 CX2.2@766,1406.03
  Bottom Layer w8: U11.2@766,1394.3 766,1412.62 cw(c810.38,1412.62) v1(779,1444) ccw(c771.24,1451.76) 782.21,1451.76 X3.1@782.21,1500 ccw(c789.97,1492.24) X3.1@779,1492.24
pads on no net: J3.4 J3.MH1 J3.MH2 J3.MH3 J3.MH4 J4.6 J4.7 J4.8 J5.6 J5.7 J5.8 J5.9 J5.MP1 J5.MP2 J5.MP3 J5.MP4 J5.MP5 J5.MP6 J5.MP7 J6.MH1 J6.MH2 QF1.4 S1.3 U5.4 U5.11 U5.12 U5.13 U5.14 U5.20 U5.21 U5.22 U5.23 U5.25 U5.26 U5.28 U5.30 U5.37 U5.38 U5.39 U5.41 U5.48 U6.2 U6.3 U6.11 U6.12 U6.13 U6.18 U6.23 U6.24 U6.25 U6.26 U6.27 U6.28 U6.29 U6.30 U6.31 U6.32 U6.33 U6.34 U6.35 U6.37 U6.38 U6.39 U6.40 U6.41 U6.42 U6.43 U6.44 U6.45 U6.47 U6.55 U6.62 U6.63 U6.64 U6.65 U6.66 U6.113 U6.114 U6.116 U6.141 U6.142 U6.143 U6.144 U8.2 U8.4 U8.5 U8.9 U9.6 U10.4 U11.3 UF5.2 UF5.3 UF5.5

## Other copper
Top Layer:
  rectangle net CHG_IN: 506,52 591,247
  rectangle net NetQ4_1: 2305,391 2448,426
  rectangle net WAKEUP: 2564,421 2694,499
  rectangle net GND: 1262.94,171 1306,255
  rectangle net VBAT_IN: 1203,274 1296,374
  rectangle net 3V8: 424,555 548,703
  rectangle net GND: 685,1300 783,1360
  region net VBAT: 207,901 159,901 159,793 207,793
  rectangle net GND: 225,793 273,901
  rectangle net GND: 25.89,600 192.89,745.59
  rectangle net 12V: 728,717 809,747
  rectangle net TS_: 666,26 724,77
  rectangle net TS_: 605,-10 724,42
  rectangle net GND: 2560,555 2628,619
  rectangle net GND: 2560,510 2670,619
  rectangle net NetQF4_1: 2684,514 2734,662
  rectangle net NetQF3_1: 2404,620 2497,675
  rectangle net GND: 2404,687 2497,750
  rectangle net GND: 1098,1808 1195,1980
  rectangle net 12V: 606,862 698,976
  rectangle net 12V: 593,957 782,1086
  rectangle net GND: 614,786 711,846
  rectangle net GND: 684,630 790,659
  rectangle net GND: 2065,1921 2156,2095
  rectangle net GND: 206,1042 237,1071
  rectangle net VUSB: 269,1458 310,1498
  rectangle net VUSB: 137,1449 310,1473
  rectangle net VDD_EXT: 861.5,1174.06 891.5,1368.94
  rectangle net VIN: 458,1120 532,1262
  rectangle net GND: 31,1110 237,1187
  rectangle net 3V3: 250.5,1088 336,1162
  rectangle net FB_: 740,520 800,621
  rectangle net GND: 1515,614 1601,703
  rectangle net 3V8: 2733,1426.35 2893,1624
  rectangle net 3V8: 2623,1143 2792.93,1624
  rectangle net GND: 2335,1143 2607,1625
  rectangle net GND: 2304,437 2388,513
Bottom Layer:
  rectangle net EN_: 35,166 124,194
  rectangle net NetQ5_1: 1066,1398 1118,1534
  rectangle net CHG_IN: 508,54 587,247
  rectangle net NetSB6_2: 178,208 208,300
  rectangle net NetCF17_2: 139,-35 165,45.08
  rectangle net EN_: 35,103 76,186
  rectangle net FB#: 97,-33 130,153
  rectangle net GND: 137,61 170,154
  rectangle net 3V8: 351.64,559 496,732
  rectangle net BOOT: 124,913.29 261,951
  rectangle net GND: 2124,462 2217,610
  rectangle net NetQF1_1: 775,-21 872,56
  rectangle net NetD1_A: 144,993.67 336,1029.67
  rectangle net GND: 631,167 738,276
  rectangle net VBAT_IN: 599,99 868,150
  rectangle net IN+: 1426,221 1485,316
  rectangle net GND: 1869,679 2639,795
  rectangle net GND: 2456,1569 2639,1688.13
  rectangle net GND: 2456,1662 2700,1823
  rectangle net 3V8: 2691,1362 2853,1543
  rectangle net GND: 1709,739 2649.04,1663
  rectangle net GND: 765,881 865,1074
  rectangle net GND: 727,513 783,683
  rectangle net GND: 1130.58,1393.3 1193,1488
  rectangle net COIN_VBAT: 204,1760 423,1965
  rectangle net COIN_VBAT: 236,1826 309,1872
  rectangle net GND: 854,1813 1229,1970
  rectangle net #U_GND: 1355,720 1384,784
  rectangle net GND: 1287,895 1320,1115
  rectangle net GND: 758,858 865,1035
  rectangle net GND: 1232,895 1319,1015
  rectangle net GND: 1330,1386 1391,1512
  rectangle net GND: 1279,1506 1352,1551
  rectangle net GND: 1030,1200 1115,1269
  rectangle net VUSB: 111,1409 246,1473
  rectangle net GND: 112,1343 245,1400
  rectangle net VIN: 498.01,1073 526,1255.81
  rectangle net VIN: 187,1091 308,1183
  rectangle net GND: 350.64,1125 486,1203
  rectangle net GND: 455,1070 486,1162
  rectangle net #U_VDD: 1396,713 1433,793

## Silkscreen, mask and mechanical layers (free items; w line width, h text height)
Top Overlay:
  lines w8: 619,-5 628,4 ; 628,-23 628,4 ; 637,-5 628,4 ; 741,1450 750,1459 ; 750,1436 750,1459 ; 759,1450 750,1459 ; 2366,375 2375,384 ; 2375,357 2375,384 ; 2384,375 2375,384
  lines w10: 1585,1717 2146,1717 2146,1862 1585,1862 1585,1717
  text "This part will be removed after programming." at 1412,1904 h45
  text "RESET SWITCH" at 1142.5,1810 h40
  text "* > 0.1uF 0402" at 1600,1806 h40
  text "# > 10K 0402" at 1599,1734 h40
  text "TESTING POINTS" at 214,1724 h50
  text "OUT_1" at 354,1606 h40
  text "RTC_VBAT" at 159,1605 h40
  text "OUT_2" at 513,1605 h40
  text "12V" at 689,1605 h40
  text "VDD_EXT" at 1566,1400 h40
  text "#" at 962,1386 h35
  text "#" at 925,1367 h35 r180
  text "SWDIO" at 1565,1310 h40
  text "GND" at 488,1301 h40
  text "#" at 711,1227 h35
  text "VIN" at 552,1225 h40
  text "SWDCLK" at 1565,1220 h40
  text "#" at 711,1175.94 h35
  text "NRST_" at 1565,1130 h40
  text "#" at 860.29,1128.94 h35
  text "#" at 711,1126 h35
  text "#U_GND" at 1565,1040 h40
  text "*" at 256,1033 h35 r180
  text "#U_DATA" at 1565,951 h40
  text "*" at 659,928 h35 r180
  text "*" at 260,897 h35 r180
  text "#U_VDD" at 1565,861 h40
  text "#" at 531,774 h35
  text "#U_RST" at 1565,771 h40
  text "*" at 1018,709 h35 r180
  text "#U_CLK" at 1565,680 h40
  text "TESTING POINTS" at 1880.03,659 h50 r90
  text "NET STATUS" at 2289,202 h45
  text "CHARGING STATUS" at 1857,198 h45
  text "3V3 POWER" at 1858,146 h45
  text "NET MODE" at 2328,131 h45
  text "STATUS" at 2336,63 h45
Bottom Overlay:
  lines w7: 252.5,1340 252.5,1348.5 ; 261,1348.5 252.5,1348.5 ; 268.5,1332.5 252.5,1348.5
  lines w8: 119,274 132,287 ; 132,228 132,287 ; 145,274 132,287 ; 1101,-6 1101,102.86 1112.14,114
  lines w10: 124,1558 1124,1558 ; 124,2172 1124,2172 ; 1860,245 1860,395 2418,395 2418,245 1860,245
  text "*" at 1610,2069 h35 r180
  text "*" at 1304.2,1953.23 h35 r180
  text "COIN CELL" at 119,1553 h50 r270
  text "COIN CELL" at 1047,1553 h50 r270
  text "*" at 2926,1489 h35 r180
  text "*" at 1229,1475 h35 r180
  text "#" at 1332,1445 h35
  text "*" at 2927,1442 h35 r180
  text "*" at 174,1367 h35 r180
  text "*" at 1313,1315 h35 r180
  text "*" at 1059,1235 h35 r180
  text "*" at 1394,1229 h35 r180
  text "#" at 130,1146 h35 r180
  text "*" at 1390,1114 h35 r180
  text "*" at 560,1104 h35 r180
  text "#" at 815,1098 h35
  text "*" at 1459,753 h35 r180
  text "* > 0.1uF 0402" at 2403,338 h40
  text "# > 10K 0402" at 2404,266 h40
  text "*" at 664,229 h35 r180
  text "BATTERY" at 1650,18 h40
  text "*" at 640,12 h35 r180
  text "-ve" at 1458,-51 h60
  text "+ve" at 1745,-51 h60
Mechanical 2:
  the board outline again, w10

## Dimensions
1385,2283 to 2290.83,2283 on Mechanical 1
1385,2283 to 2980,1894 on Mechanical 1
2980,-75 to 2980,1894 on Mechanical 1
-1,2406 to 1350,2406 on Mechanical 1
-1,-75 to -1,2406 on Mechanical 1
2980,-75 to -1,-75 on Mechanical 1